# Altium PCB Monitor_Node.PcbDoc
Units mm, origin at the board's own origin, x right, y up, seen from the top; angles counter-clockwise.
Board outline 88.01 x 92.96 mm, 2 copper layers (Top Layer, Bottom Layer); 98 components, 63 nets, 354 pads, 41 vias.
Unrouted connection lines stored in the file: 2.
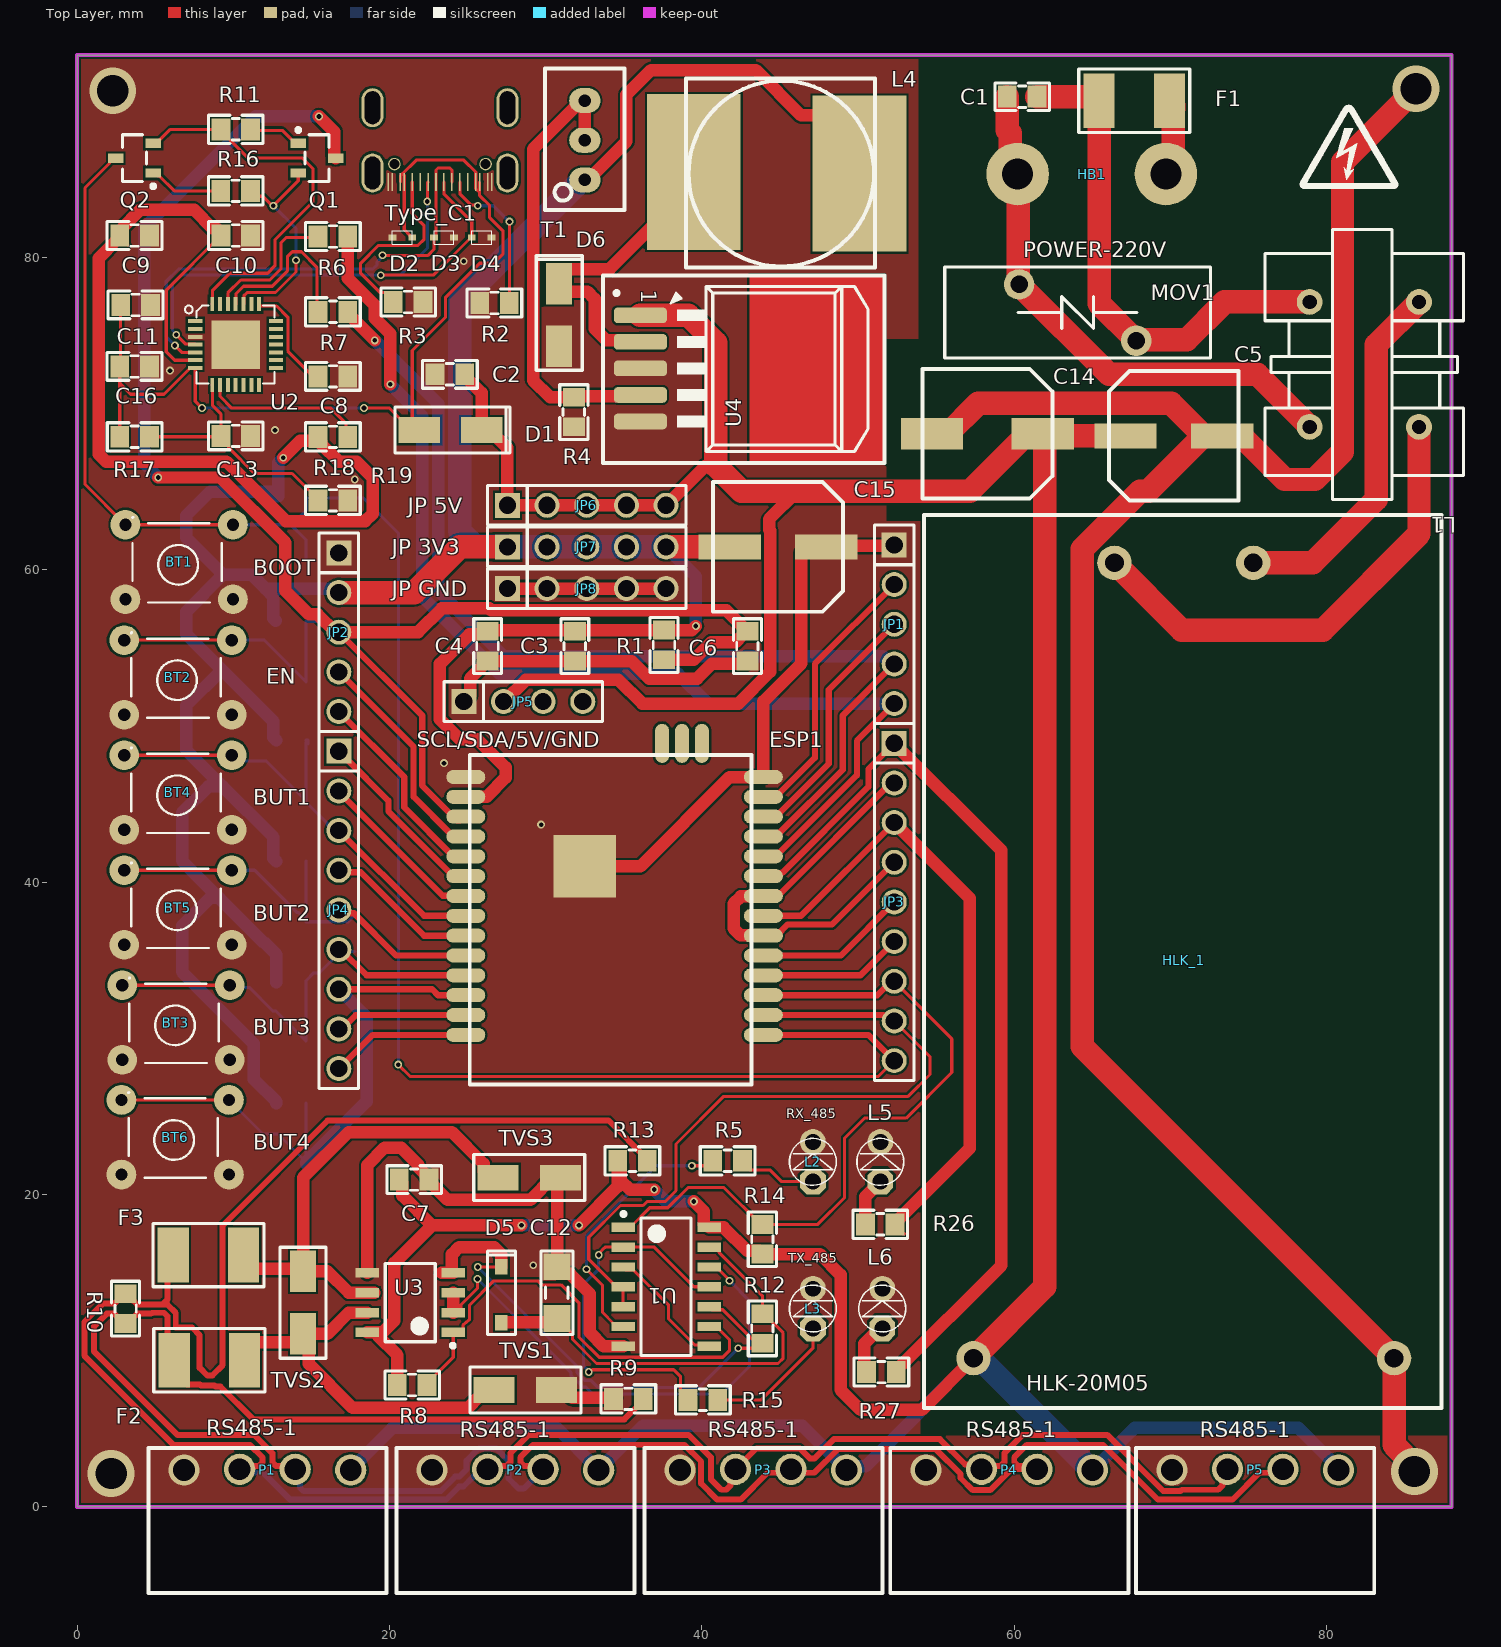
[diagram p0: Top Layer view]
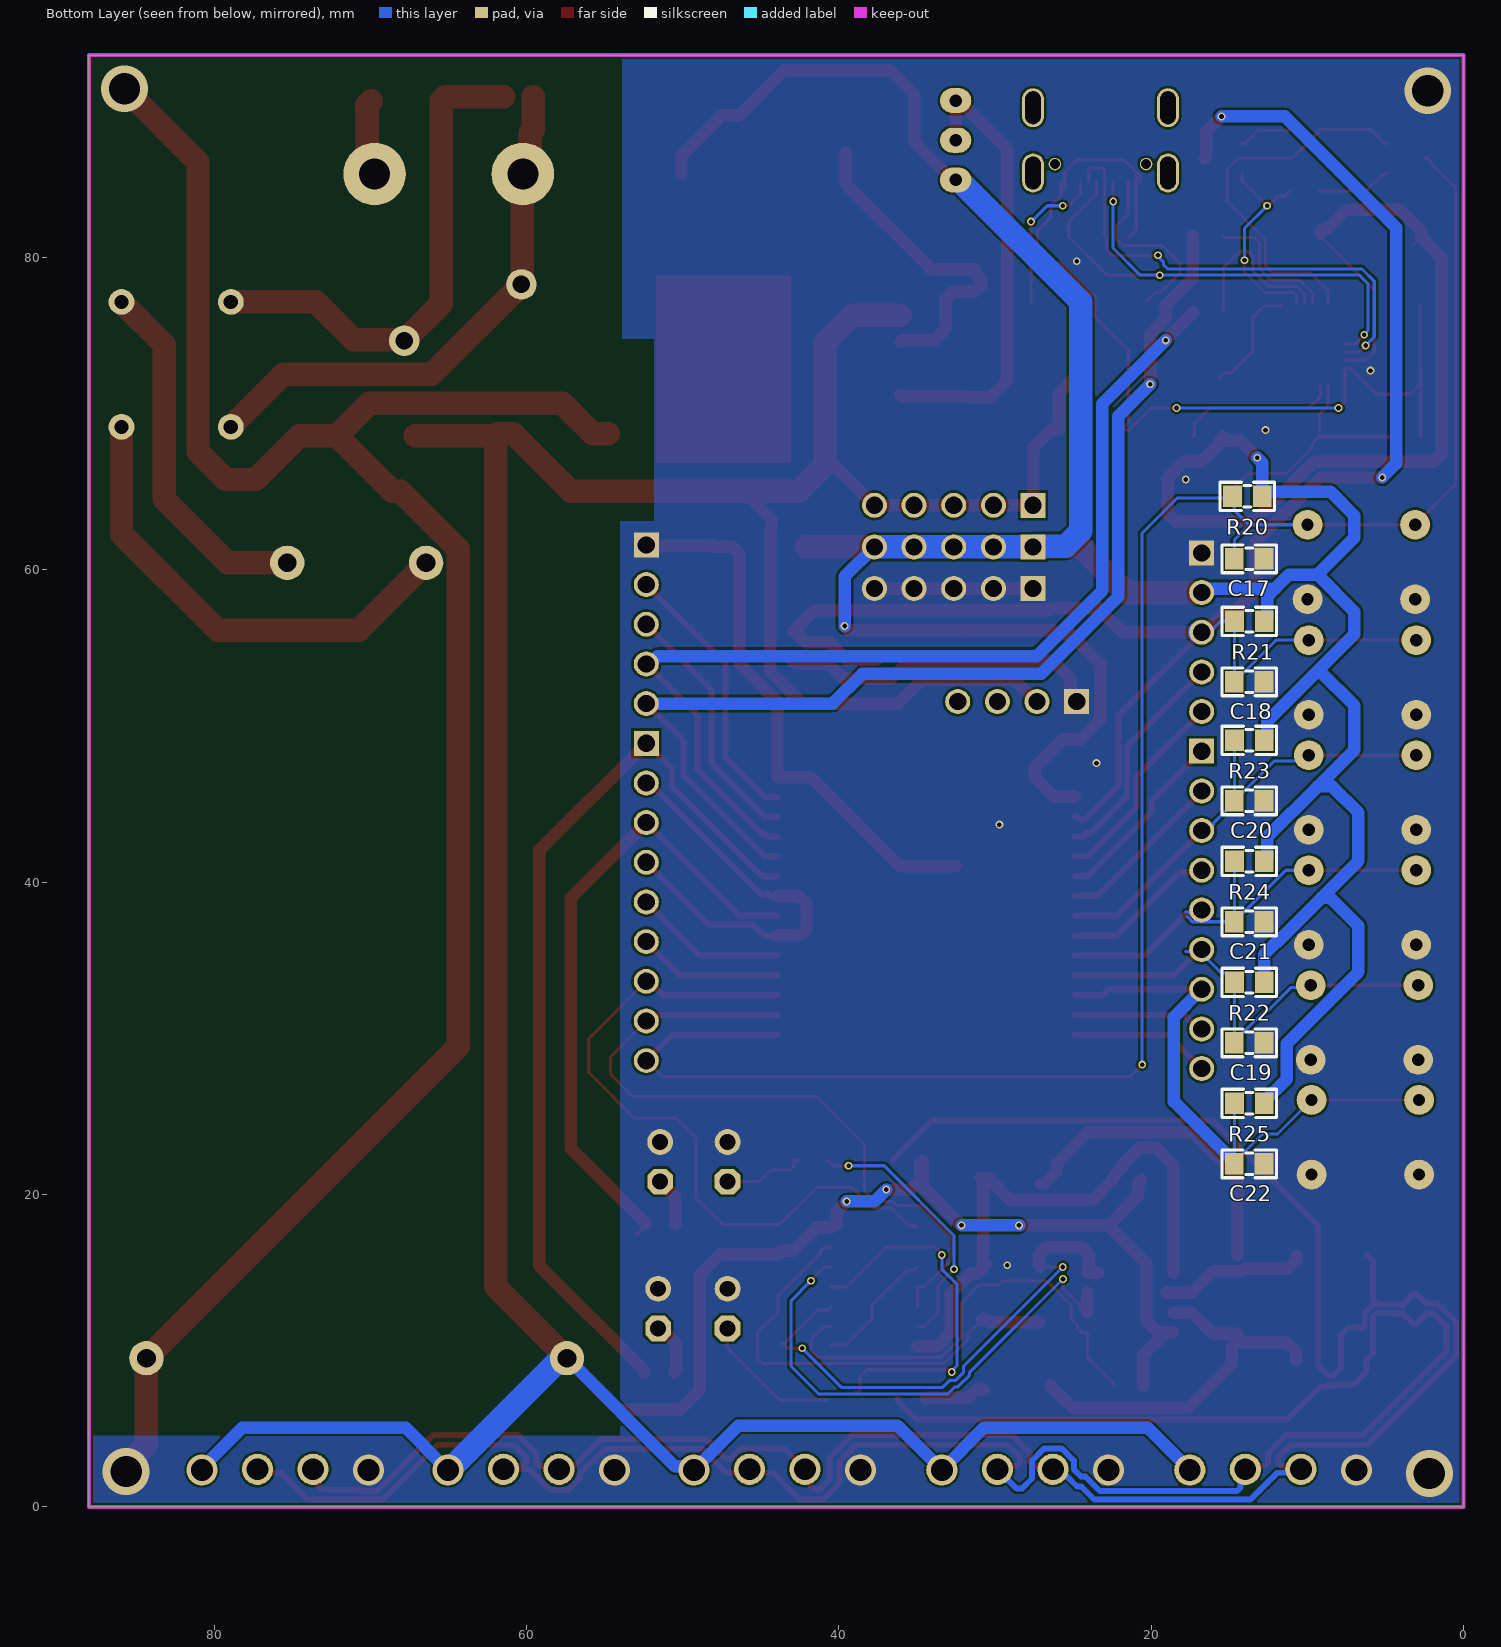
[diagram p1: Bottom Layer view, seen from below]
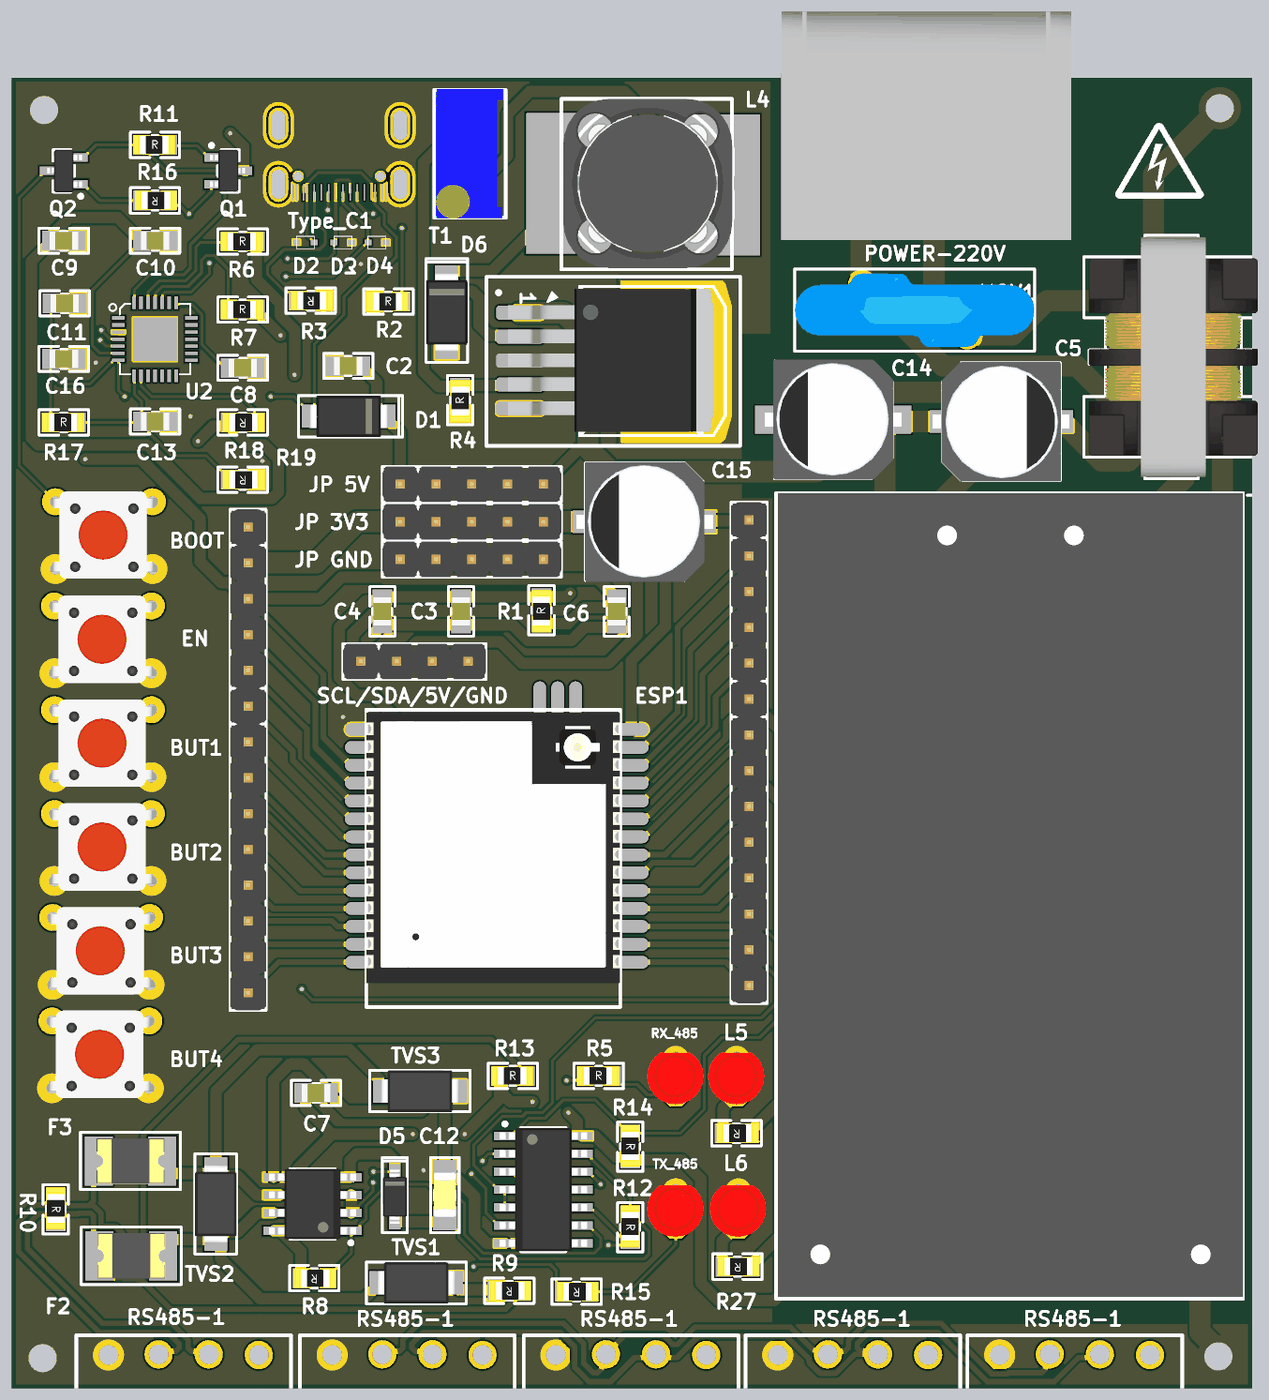
[diagram p2: 3D render of the assembled board from above, using the file's embedded part models]
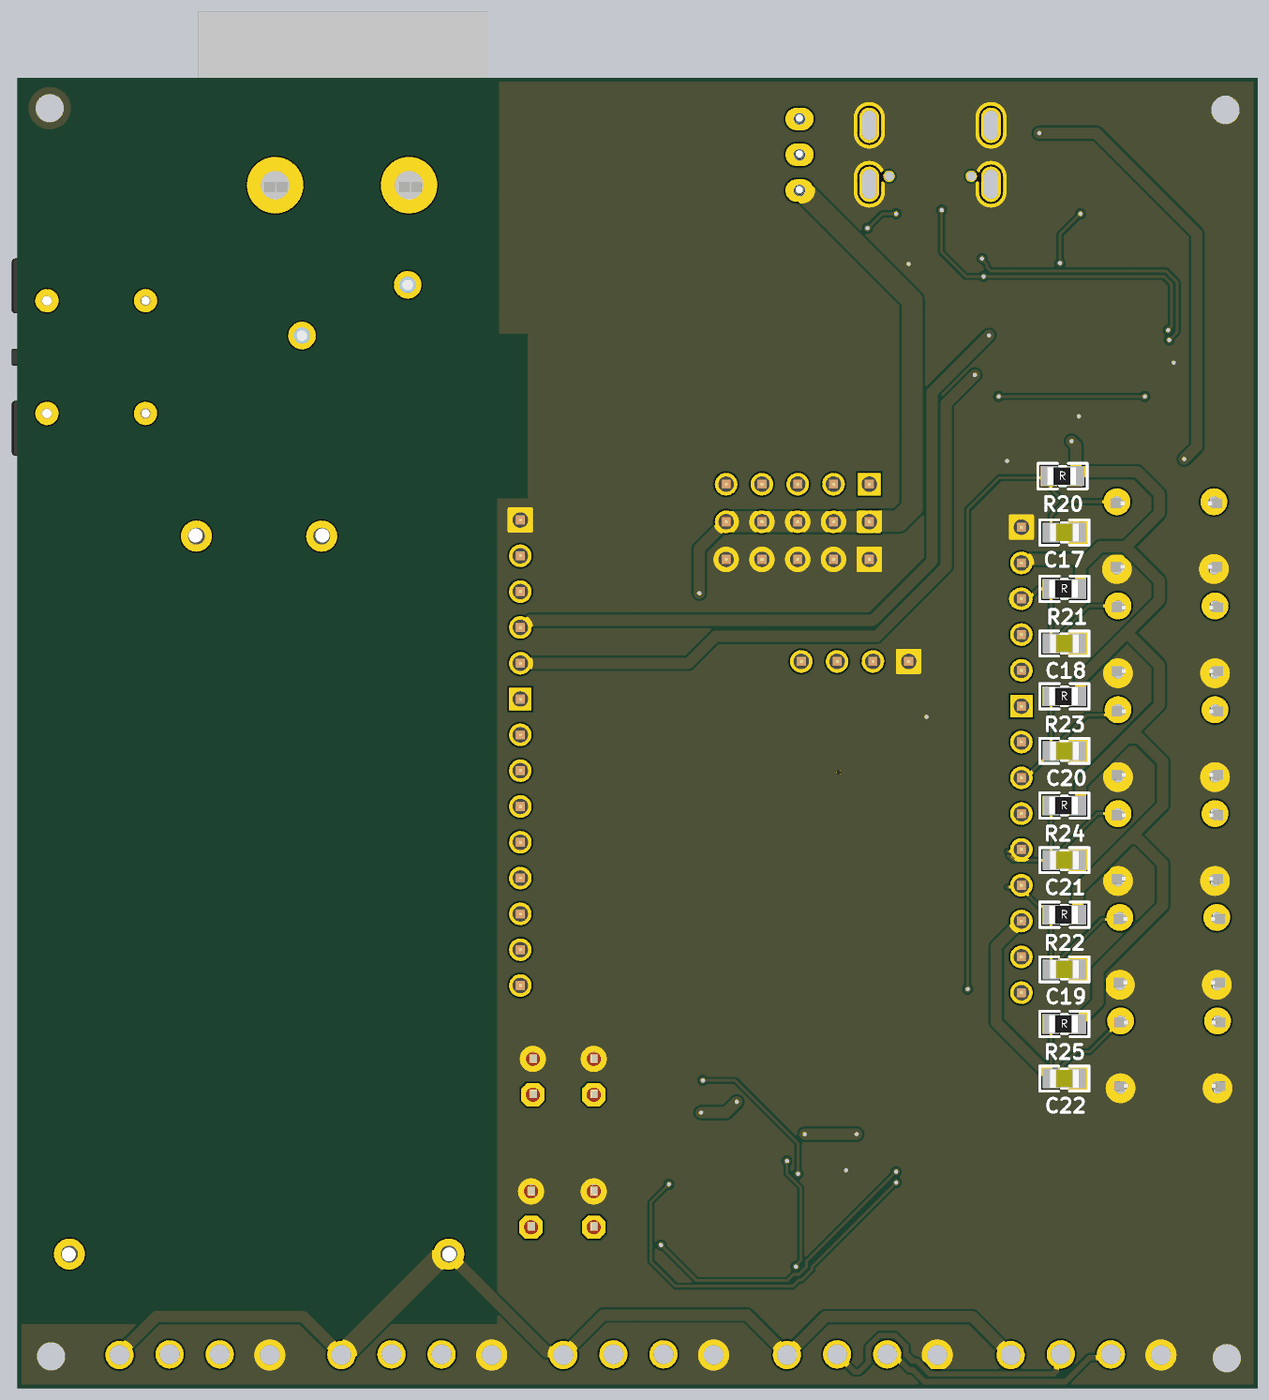
[diagram p3: 3D render of the assembled board from below, using the file's embedded part models]

## Layer stack, top to bottom
Top Solder: solder mask 0.0102, Solder Resist, Dk 3.5
Top Layer: signal copper 0.0356
Dielectric 1: dielectric 0.32, FR-4, Dk 4.8
Bottom Layer: signal copper 0.0356
Bottom Solder: solder mask 0.0102, Solder Resist, Dk 3.5

## Board outline
0,0 0,92.964 88.011,92.964 88.011,0

## Design rules (kind name [scope] priority, off if disabled: settings)
Clearance [All] p1: gap=0.15 ignorepadtopadclearanceinfootprint=FALSE
DiffPairsRouting [All] p1: maxlimit=0.5 minlimit=0.15 mostfreqgap=0.254 toplayer_minwidth=0.15 toplayer_maxwidth=0.381 toplayer_prefwidth=0.381 bottomlayer_minwidth=0.15 bottomlayer_maxwidth=0.381 bottomlayer_prefwidth=0.381 maxuncoupledlength=12.7
PolygonConnect [All] p1: connectstyle=Direct reliefconductorwidth=0.254 reliefentries=4 polygonreliefangle="90 Angle" airgapwidth=0.254
RoutingVias [All] p1: holewidth=0.711 width=1.27 viastyle="Through Hole" minholewidth=0.3 minwidth=0.5 maxholewidth=0.711 maxwidth=1.27
SilkToSilkClearance [All] p1: silktosilkclearance=0.1
SilkToSolderMaskClearance [IsPad] p1: minsilkscreentomaskgap=0.01 clearancetoexposedcopper=TRUE
SolderMaskExpansion [All] p1: expansion=0.102 istentingtop=FALSE
Width [All] p1: maxlimit=1.5 minlimit=0.2 preferedwidth=0.4
27 further rules are at their usual default settings.

## Classes and differential pairs
differential pair RS485: +RS485_P -RS485_N

## Components (designator, comment, footprint, x,y, rotation, side; value= is the part's Value field where it differs from the comment)
BT1 "BOOT" "Nut Nhan 4 Chan Cam 6x6" 9.652,57.912 r180 top
BT2 "EN" "Nut Nhan 4 Chan Cam 6x6" 9.576,50.521 r180 top
BT3 "BUT3" "Nut Nhan 4 Chan Cam 6x6" 9.449,28.423 r180 top
BT4 "BUT1" "Nut Nhan 4 Chan Cam 6x6" 9.576,43.155 r180 top
BT5 "BUT2" "Nut Nhan 4 Chan Cam 6x6" 9.576,35.789 r180 top
BT6 "BUT4" "Nut Nhan 4 Chan Cam 6x6" 9.398,21.082 r180 top
C1 "104 0.1uF/275V" "tu 0805" 60.517,90.294 r180 top
C2 "106" "tu 0805" 23.876,72.517 r180 top
C3 "106 (10V/20%)" "tu 0805" 31.877,55.118 r270 top
C4 "104 (10V/10%)" "tu 0805" 26.289,55.118 r270 top
C5 "220uF" "tu nhom 8 (e)" 70.231,68.58 r0 top
C6 "105 (10V/10%)" "tu 0805" 42.926,55.118 r270 top
C7 "104 100n" "tu 0805" 21.59,20.955 r180 top
C8 "104 (10V/10%)" "tu 0805" 16.383,72.39 r0 top
C9 "104 (10V/10%)" "tu 0805" 3.683,81.407 r0 top
C10 "104 (10V/10%)" "tu 0805" 10.16,81.407 r0 top
C11 "106 (10V/20%)" "tu 0805" 3.745,76.965 r0 top
C12 "100pF" "tu 1206" 30.734,13.716 r90 top
C13 "106 (10V/20%)" "tu 0805" 10.16,68.58 r0 top
C14 "100uF" "tu nhom 8 (f)" 58.293,68.707 r180 top
C15 "220uF" "tu nhom 8 (e)" 44.883,61.468 r180 top
C16 "104 (10V/10%)" "tu 0805" 3.683,73.025 r0 top
C17 "105 (10V/10%)" "tu 0805" 13.716,60.706 r0 bottom
C18 "105 (10V/10%)" "tu 0805" 13.716,52.832 r0 bottom
C19 "105 (10V/10%)" "tu 0805" 13.716,29.718 r0 bottom
C20 "105 (10V/10%)" "tu 0805" 13.716,45.212 r0 bottom
C21 "105 (10V/10%)" "tu 0805" 13.716,37.465 r0 bottom
C22 "105 (10V/10%)" "tu 0805" 13.716,21.971 r0 bottom
D1 "1N5819(SS14)-SM" SMA-J_DO-214AC 23.908,68.961 r0 top
D2 "LESD5D5.0CT1G" LESD5D5.0CT1G, 21.463,80.835 r90 top
D3 "LESD5D5.0CT1G" LESD5D5.0CT1G, 22.86,81.725 r270 top
D4 "LESD5D5.0CT1G" LESD5D5.0CT1G, 25.273,81.725 r270 top
D5 "1N4148(T4)-SM" SOD123G_DO-215AD 27.178,13.589 r90 top
D6 "1N5824(SS54)-SM" SMA-J_DO-214AC 30.861,76.327 r90 top
ESP1 "ESP32-C5-WROOM-1/1U" ESP32-C5-WROOM-1/1U 25.146,27.051 r0 top
F1 "FUSE-CHIP-SM" FUSE-CHIP-1812-SM 67.691,90.043 r180 top
F2 "FUSE 1208" FUSE-CHIP-1812-SM 8.473,9.398 r180 top
F3 "FUSE 1208" FUSE-CHIP-1812-SM 8.418,16.129 r180 top
HB1 "POWER-220V" HB9500 69.723,85.344 r180 top
HLK_1 "HLK_20M05" HLK_20M05 87.376,63.5 r180 top
JP1 "JP esp" "JP 1x5 DT" 52.324,61.595 r270 top
JP2 "JP esp" "JP 1x5 DT" 16.764,61.087 r270 top
JP3 "JP esp" "JP 1x9 DT" 52.324,48.895 r270 top
JP4 "JP esp" "JP 1x9 DT" 16.764,48.387 r270 top
JP5 "SCL/SDA/5V/GND" "JP 1x4 DT" 24.765,51.562 r0 top
JP6 "JP 5V" "JP 1x5 DT" 27.559,64.135 r0 top
JP7 "JP 3V3" "JP 1x5 DT" 27.559,61.468 r0 top
JP8 "JP GND" "JP 1x5 DT" 27.559,58.801 r0 top
L1 "10uH" L-UU9.8-L17.0-W12.0-H17.0-TH 82.423,73.152 r90 top
L2 "RX_485" LED-3MM-RED 47.117,20.828 r90 top
L3 "TX_485" LED-3MM-RED 47.117,11.43 r90 top
L4 "33uH - 3A SMD" "Cuon Cam 12x12x10" 51.097,79.371 r90 top
L5 "LED_1" LED-3MM-RED 51.435,20.828 r90 top
L6 "LED_2" LED-3MM-RED 51.562,11.43 r90 top
MOV1 "10D561-560V" MOV-P7.5-D17.0-T3.6-TH 64.068,76.476 r180 top
P1 "RS485-1" "15EDG - 4P" 19.812,3.762 r180 top
P2 "RS485-1" "15EDG - 4P" 35.687,3.762 r180 top
P3 "RS485-1" "15EDG - 4P" 51.562,3.762 r180 top
P4 "RS485-1" "15EDG - 4P" 67.31,3.762 r180 top
P5 "RS485-1" "15EDG - 4P" 83.058,3.762 r180 top
Q1 "S8050(J3Y)-SM" SOT23-3_TO-236AB 15.367,86.36 r0 top
Q2 "S8050(J3Y)-SM" SOT23-3_TO-236AB 3.683,86.36 r180 top
R1 "10k" "tro smd 0805" 37.526,55.188 r90 top
R2 "5.1k" "tro smd 0805" 26.727,77.15 r0 top
R3 "5.1k" "tro smd 0805" 21.209,77.089 r180 top
R4 "1.2k" "tro smd 0805" 31.75,70.104 r90 top
R5 "1k" "tro smd 0805" 41.656,22.225 r0 top
R6 "4.7k" "tro smd 0805" 16.383,81.407 r0 top
R7 "4.7k" "tro smd 0805" 16.383,76.581 r0 top
R8 "4.7k" "tro smd 0805" 21.463,7.747 r180 top
R9 "4.7k" "tro smd 0805" 35.306,6.858 r180 top
R10 "120R" "tro smd 0805" 3.175,12.7 r270 top
R11 "10k" "tro smd 0805" 10.16,88.265 r0 top
R12 "56k" "TRO SMD 0805" 43.942,11.43 r270 top
R13 "4.7k" "tro smd 0805" 35.56,22.225 r0 top
R14 "4.7k" "tro smd 0805" 43.942,17.145 r270 top
R15 "1k" "tro smd 0805" 40.075,6.797 r180 top
R16 "10k" "tro smd 0805" 10.16,84.201 r180 top
R17 "22k" "tro smd 0805" 3.683,68.58 r0 top
R18 "1k" "tro smd 0805" 16.383,68.453 r180 top
R19 "22k" "tro smd 0805" 16.383,64.389 r180 top
R20 "10k" "tro smd 0805" 13.843,64.77 r180 bottom
R21 "10k" "tro smd 0805" 13.716,56.769 r180 bottom
R22 "10k" "tro smd 0805" 13.716,33.655 r180 bottom
R23 "10k" "tro smd 0805" 13.716,49.149 r180 bottom
R24 "10k" "tro smd 0805" 13.716,41.402 r180 bottom
R25 "10k" "tro smd 0805" 13.716,25.908 r180 bottom
R26 "330R" "Tro SMD 0805" 51.435,18.034 r180 top
R27 "330R" "Tro SMD 0805" 51.5,8.575 r180 top
T1 "10K" "Bien Tro Vi Chinh Dung" 32.512,87.503 r90 top
TVS1 "SMAJ6.5CA-SM" SMA-J_DO-214AC_TVS-BI 28.702,7.493 r0 top
TVS2 "SMAJ6.5CA-SM" SMA-J_DO-214AC_TVS-BI 14.478,13.081 r270 top
TVS3 "SMAJ6.5CA-SM" SMA-J_DO-214AC_TVS-BI 28.956,21.082 r180 top
Type_C1 "Type_C_16P" Type_C_16P 23.241,84.836 r180 top
U1 "74HC14-SM" SOIC14-1.27-150MIL 37.719,14.097 r0 top
U2 "cp2102" cp2102 10.16,74.422 r0 top
U3 "MAX485-SM" SOIC8-1.27-150MIL 21.336,13.081 r180 top
U4 "LM2976" TO263 42.037,73.279 r270 top

## Footprints (in the part's own frame and the unit in brackets; to place one, negate y for a bottom-side part, rotate by r counter-clockwise, add the part's x,y. Pads: shape width x height; smd on the part's side, far side on the other; paste and mask are expansions set on the pad)
"15EDG - 4P" [mm]
  round 2 hole 1.4: 1(2.286,1.397) 2(5.842,1.349) 3(9.398,1.349) 4(12.954,1.397)
  silkscreen extent 0,0 15.24,9.27
"Bien Tro Vi Chinh Dung" [mm] "Bien tro vi chinh"
  oval 1.6x2 hole 0.8: 1(-2.54,0) 2(0,0) 3(2.54,0)
  silkscreen extent -4.47,-2.54 4.6,2.54, body extent -4.54,-2.4 4.66,2.4, height 12.02
cp2102 [mm]
  rect 0.9x0.254 smd: 1(-2.59,1.5) 2(-2.59,1) 3(-2.59,0.5) 4(-2.59,0) 5(-2.59,-0.5) 6(-2.59,-1) 7(-2.59,-1.5) 15(2.59,-1.5) 16(2.59,-1) 17(2.59,-0.5) 18(2.59,0) 19(2.59,0.5) 20(2.59,1) 21(2.59,1.5)
  rect 0.254x0.9 smd: 8(-1.5,-2.59) 9(-1,-2.59) 10(-0.5,-2.59) 11(0,-2.59) 12(0.5,-2.59) 13(1,-2.59) 14(1.5,-2.59) 22(1.5,2.59) 23(1,2.59) 24(0.5,2.59) 25(0,2.59) 26(-0.5,2.59) 27(-1,2.59) 28(-1.5,2.59)
  rect 3.1x3.1 smd: 29(0,0)
  silkscreen extent -3.25,-2.5 2.5,2.5, body extent -2.51,-2.51 2.5,2.5, height 0.5
"Cuon Cam 12x12x10" [mm] "Cuon Cam 12x12x10"
  rect 10x6 smd: 1(6.1,11.6) 2(6,1)
  silkscreen extent 0,0 12.1,12.1, body extent 0.1,-0.2 12.1,12.14, height 7.51
ESP32-C5-WROOM-1/1U [mm] "QFP, 62-Leads, Body 15.40x19.35mm, Pitch 0.65mm, IPC Medium Density"
  oval 2.5x0.9 smd: 1(-0.254,19.685) 2(-0.254,18.415) 3(-0.254,17.145) 4(-0.254,15.875) 5(-0.254,14.605) 6(-0.254,13.335) 7(-0.254,12.065) 8(-0.254,10.795) 9(-0.254,9.525) 10(-0.254,8.255) 11(-0.254,6.985) 12(-0.254,5.715) 13(-0.254,4.445) 14(-0.254,3.175) 15(18.796,3.175) 16(18.796,4.445) 17(18.796,5.715) 18(18.796,6.985) 19(18.796,8.255) 20(18.796,9.525) 21(18.796,10.795) 22(18.796,12.065) 23(18.796,13.335) 24(18.796,14.605) 25(18.796,15.875) 26(18.796,17.145) 27(18.796,18.415) 28(18.796,19.685)
  rect 4x4 smd: 29(7.366,13.97)
  oval 0.9x2.5 smd: 30(14.859,21.844) 31(13.589,21.844) 32(12.319,21.844)
  silkscreen extent 0,0 18.03,21.08, body extent 0.01,1.68 18.03,20.88, height 3.1
FUSE-CHIP-1812-SM [mm]
  rect 2x3.5 smd: 1(-2.25,0) 2(2.25,0)
  silkscreen extent -3.56,-2.03 3.56,2.03, body extent -2.41,-1.61 2.41,1.61, height 1.32
HB9500 [mm]
  round 4 hole 2: 1(0,0) 2(9.5,0)
  body extent -5.47,-12.32 15.13,3.88, height 25.04
HLK_20M05 [mm]
  round 2.2 hole 1.2: 1(12.065,3.048) 2(20.955,3.048) 3(3.048,53.975) 4(29.972,53.975)
  silkscreen extent 0,0 33.15,57.15, body extent 0,0 33,57, height 23
"JP 1x4 DT" [mm] "4 pins, 1 row, straight, gold plating"
  rect 1.6x1.6 hole 1.1: 1(0,0)
  round 1.6 hole 1.1: 2(2.54,0) 3(5.08,0) 4(7.62,0)
  silkscreen extent -1.27,-1.27 8.89,1.27, body extent -1.27,-1.27 8.89,1.27, height 8.54
"JP 1x5 DT" [mm] "5 pins, 1 row, straight, gold plating"
  rect 1.6x1.6 hole 1.1: 1(0,0)
  round 1.6 hole 1.1: 2(2.54,0) 3(5.08,0) 4(7.62,0) 5(10.16,0)
  silkscreen extent -1.27,-1.27 11.43,1.27, body extent -1.27,-1.27 11.43,1.27, height 8.54
"JP 1x9 DT" [mm] "9 pins, 1 row, straight, gold plating"
  rect 1.6x1.6 hole 1.1: 1(0,0)
  round 1.6 hole 1.1: 2(2.54,0) 3(5.08,0) 4(7.62,0) 5(10.16,0) 6(12.7,0) 7(15.24,0) 8(17.78,0) 9(20.32,0)
  silkscreen extent -1.27,-1.27 21.59,1.27, body extent -1.27,-1.27 21.59,1.27, height 8.54
L-UU9.8-L17.0-W12.0-H17.0-TH [mil]
  round 65 hole 36: 1(-157.48,137.8) 2(-157.48,-137.8) 3(157.48,137.8) 4(157.48,-137.8)
  silkscreen extent -340,-250 340,250, body extent -335,-236 335,236, height 669
LED-3MM-RED [mil]
  oct 65x65 hole 40: 1(0,0)
  round 65 hole 40: 2(100,0)
  silkscreen extent -9,-59 109,59, body extent -27,-77 117,80, height 181
LESD5D5.0CT1G, [mm]
  rect 0.4x0.5 smd: 1(0.445,1.27) 2(0.445,0)
  silkscreen extent 0,0 0.89,1.27
MOV-P7.5-D17.0-T3.6-TH [mil]
  round 77 hole 44: 1(-147.64,70.87) 2(147.64,-70.87)
  silkscreen extent -335,-115 335,115, body extent -335,-102 335,102, height 787
"Nut Nhan 4 Chan Cam 6x6" [mil] "SW button 4pin, 250 x250 mil"
  round 75 hole 31: 1(-13,-8) 1(258,-8) 2(-13,-196) 2(258,-196)
  silkscreen extent 15,-215 240,0, body extent -31,-225 281,19, height 276
SMA-J_DO-214AC [mm]
  rect 2.65x1.65 smd: 1(-2,0) 2(2,0)
  silkscreen extent -3.55,-1.49 3.81,1.46, body extent -2.8,-1.49 2.8,1.46, height 2.9
SMA-J_DO-214AC_TVS-BI [mm]
  rect 2.65x1.65 smd: 1(-2,0) 2(2,0)
  silkscreen extent -3.55,-1.49 3.56,1.46, body extent -2.8,-1.48 2.8,1.48, height 2.9
SOD123G_DO-215AD [mm]
  rect 1x0.8 smd: 1(-1.8,0) 2(1.8,0)
  silkscreen extent -2.54,-0.89 2.79,0.89, body extent -1.92,-0.85 1.93,0.85, height 1.35
SOIC8-1.27-150MIL [mm]
  rect 1.5x0.6 smd: 1(-2.75,1.905) 2(-2.75,0.635) 3(-2.75,-0.635) 4(-2.75,-1.905) 5(2.75,-1.905) 6(2.75,-0.635) 7(2.75,0.635) 8(2.75,1.905)
  silkscreen extent -2.85,-2.5 1.6,2.88, body extent -3.1,-2.5 3.1,2.5, height 1.75
SOIC14-1.27-150MIL [mm]
  rect 1.5x0.6 smd: 1(-2.75,3.81) 2(-2.75,2.54) 3(-2.75,1.27) 4(-2.75,0) 5(-2.75,-1.27) 6(-2.75,-2.54) 7(-2.75,-3.81) 8(2.75,-3.81) 9(2.75,-2.54) 10(2.75,-1.27) 11(2.75,0) 12(2.75,1.27) 13(2.75,2.54) 14(2.75,3.81)
  silkscreen extent -2.85,-4.4 1.6,4.78, body extent -3.1,-4.37 3.1,4.38, height 1.75
SOT23-3_TO-236AB [mm]
  rect 1x0.6 smd: 1(-1.2,0.95) 2(-1.2,-0.95) 3(1.2,0)
  silkscreen extent -1.32,-1.5 0.76,1.92, body extent -1.3,-1.5 1.3,1.5, height 1.1
TO263 [mm]
  rrect50% 1x3.4 smd: 1(-3.019,-5.969) 2(-1.319,-5.969) 4(2.081,-5.969) 5(3.781,-5.969)
  rrect50% 1x3.4 smd mask+0: 3(0.381,-5.969)
  Top Layer region: -5.568,1.016 6.432,1.016 6.432,9.65 -5.568,9.65
  silkscreen extent -5.57,-8.35 6.43,9.65, body extent -4.73,-6.84 5.43,7.8, height 4.57
"tro smd 0805" [mm]
  rect 1.2x1.4 smd: 1(-0.946,-0.061) 2(0.954,-0.061)
  silkscreen extent -1.75,-0.97 1.75,0.84, body extent -1.56,-0.76 1.44,0.64, height 0.53
"TRO SMD 0805" [mm]
  rect 1.2x1.4 smd: 1(-0.946,-0.061) 2(0.954,-0.061)
  silkscreen extent -1.75,-0.97 1.75,0.84, body extent -1.56,-0.76 1.44,0.64, height 0.53
"Tro SMD 0805" [mm]
  rect 1.2x1.4 smd: 1(-0.946,-0.061) 2(0.954,-0.061)
  silkscreen extent -1.75,-0.97 1.75,0.84, body extent -1.56,-0.76 1.44,0.64, height 0.53
"tu 0805" [mm] "Compoment SMD 80x50mil"
  rect 1.2x1.4 smd: 1(-0.946,-0.003) 2(0.954,-0.003)
  silkscreen extent -1.75,-0.89 1.75,0.89, body extent -1.01,-0.64 1.01,0.63, height 0.61
"tu 1206" [mm]
  rect 1.7x1.7 smd: 1(-1.65,0) 2(1.65,0)
  silkscreen extent -2.67,-1.02 2.67,1.02, body extent -1.57,-0.8 1.63,0.8, height 0.94
"tu nhom 8 (e)" [mm]
  rect 4x1.6 smd: 1(-3.1,0) 2(3.1,0)
  silkscreen extent -4.15,-4.15 4.15,4.15, body extent -4.88,-4.25 4.82,4.25, height 10.5
"tu nhom 8 (f)" [mm]
  rect 4x2 smd: 1(-3.55,0) 2(3.55,0)
  silkscreen extent -4.15,-4.15 4.15,4.15, body extent -4.85,-4.25 4.85,4.25, height 10.5
Type_C_16P [mm]
  rect 0.1x1.15 smd: A1(-3.302,0) A4(-2.54,0) A5(-1.27,0) A6(-0.25,0) A7(0.254,0) A8(1.274,0) A9(2.54,0) A12(3.302,0) B1(3.048,0) B4(2.286,0) B5(1.778,0) B6(0.762,0) B7(-0.762,0) B8(-1.774,0) B9(-2.286,0) B12(-3.048,0)
  rrect100% 1.4x2.5 hole 2.1 slot 1 at 0 deg mask+0.4: ""(-4.32,-4.755) ""(-4.316,-0.575) ""(4.32,-0.575) ""(4.32,-4.755)
  round 0.8 hole 0.65 mask+0: ""(-2.921,-1.143) ""(2.921,-1.143)
  body extent -4.47,-7.48 4.47,0.12, height 3.23

## Part data
BT1 BT2 BT3 BT4 BT5 BT6: library part "Nut Nhan 4 Chan Cam 6x6", "Nut Nhan 4 Chan 6x6mm", Ma_Hang=MH004584, Ten="Nút Nhấn 4 Chân 6x6x5MM DIP"
C1 C4 C7 C8 C9 C10 C16: library part "Tu 0805 104 50V 10%", "Dán", Chung_Loai=Dán, Don_Vi=Con, Ma_Hang=MH004551, So_Chan=2, Ten_Linh_Kien="Tụ 0805 104-100nF 10% 50V"
C2 C3 C11 C13: library part "Tu 0805 106 16V 10%", "Dán", Chung_Loai=Dán, Don_Vi=Con, Ma_Hang=MH004553, So_Chan=2, Ten_Linh_Kien="Tụ 0805 106-10uF 10% 16V"
C5 C15: library part "Tu Nhom 220uF 10V", "Dán", Chung_Loai=Dán, Don_Vi=Con, Ma_Hang=MH004021, So_Chan=2, Ten_Linh_Kien="Tụ Nhôm 220uF 10V"
C6 C17 C18 C19 C20 C21 C22: library part "Tu 0805 105 50V 10%", "Dán", Chung_Loai=Dán, Don_Vi=Con, Ma_Hang=MH004552, So_Chan=2, Ten_Linh_Kien="Tụ 0805 105-1uF 10% 50V"
C12: library part "Tu 1206 4.7nF 50V", "Dán", Chung_Loai=Dán, Don_Vi=Con, Ma_Hang=MH007538, So_Chan=2, Ten_Linh_Kien="Tụ 1206 4.7nF 50V NPO"
C14: library part "Tu Nhom 100uF 50V", "Dán", Chung_Loai=Dán, Don_Vi=Con, Ma_Hang=MH002223, So_Chan=2, Ten_Linh_Kien="Tụ Nhôm 100uF 50V 8x10.2MM"
D1: "1.0A Schottky Barrier Rectifiers - Surface Mount"
D5: "Fast Switching Diode - Surface Mount"
D6: "5.0A Schottky Barrier Rectifiers - Surface Mount"
F1: "Chip Fuses - Surface Mount"
F2 F3: library part FUSE-CHIP-SM, "Chip Fuses - Surface Mount"
HB1: library part HB9500
JP1 JP2 JP6 JP7 JP8: library part "JP 1x5 2.54 Duc Thang", "Cắm", Chung_Loai=Cắm, Don_Vi=Con, Ma_Hang=MH000903, Ten_Linh_Kien="Jump Đơn Đực 2.54MM 1x40P Thẳng 11MM"
JP3 JP4: library part "JP 1x9 2.54 Duc Thang", "Cắm", Chung_Loai=Cắm, Don_Vi=Con, Ma_Hang=MH000903, Ten_Linh_Kien="Jump Đơn Đực 2.54MM 1x40P Thẳng 11MM"
JP5: library part "JP 1x4 2.54 Duc Thang", "Cắm", Chung_Loai=Cắm, Don_Vi=Con, Ma_Hang=MH000903, Ten_Linh_Kien="Jump Đơn Đực 2.54MM 1x40P Thẳng 11MM"
L1: library part L-FILTER-TH, "EMI Filter Inductor - Through Hole"
L2 L3 L5 L6: library part "LED 3mm Do", "Cắm", Chung_Loai=Cắm, Don_Vi=Con, Ma_Hang=MH003892, Ten_Linh_Kien="Led 3MM Phủ Đỏ (10c)"
L4: library part "CUON CAM 100uH SMD", "Dán", Chung_Loai=Dán, Don_Vi=Con, Ten_Linh_Kien="Cuộn Cảm 100uH 7x7x4MM CD74"
MOV1: library part MOV-TH, "Metal Oxide Varistor - Through Hole"
P1 P2 P3 P4 P5: library part "15EDG - 4P", "15EDG - 4P - 3.81 mm"
Q1 Q2: "0.5A 25V NPN General Purpose Transistors - Surface Mount"
R1 R11 R16 R20 R21 R22 R23 R24 R25: library part "Tro 0805 5% 10k", "Dán", Chung_Loai=Dán, Don_Vi=Con, Ma_Hang=MH005239, So_Chan=2, Ten_Linh_Kien="Trở 0805 5% 10k"
R2 R3: library part "Tro 0805 1% 5.1k", "Dán", Chung_Loai=Dán, Don_Vi=Con, Ma_Hang=MH008812, So_Chan=2, Ten_Linh_Kien="Trở 0805 1% 5.1k"
R4: library part "Tro 0805 5% 1.2k", "Dán", Chung_Loai=Dán, Don_Vi=Con, Ma_Hang=MH005231, So_Chan=2, Ten_Linh_Kien="Trở 0805 5% 1.2k"
R5 R15 R18: library part "Tro 0805 1% 1k", "Dán", Chung_Loai=Dán, Don_Vi=Con, Ma_Hang=MH005468, So_Chan=2, Ten_Linh_Kien="Trở 0805 1% 1k"
R6 R7 R8 R9 R13 R14: library part "Tro 0805 5% 4.7k", "Dán", Chung_Loai=Dán, Don_Vi=Con, Ma_Hang=MH005307, So_Chan=2, Ten_Linh_Kien="Trở 0805 5% 4.7k"
R10: library part "Tro 0805 5% 120R", "Dán", Chung_Loai=Dán, Don_Vi=Con, Ma_Hang=MH005253, So_Chan=2, Ten_Linh_Kien="Trở 0805 5% 120R"
R12: library part "Tro 0805 5% 56k", "Dán", Chung_Loai=Dán, Don_Vi=Con, Ma_Hang=MH005322, So_Chan=2, Ten_Linh_Kien="Trở 0805 5% 56k"
R17 R19: library part "Tro 0805 5% 22k", "Dán", Chung_Loai=Dán, Don_Vi=Con, Ma_Hang=MH005248, So_Chan=2, Ten_Linh_Kien="Trở 0805 5% 22k"
R26 R27: library part "Tro 0805 5% 330R", "Dán", Chung_Loai=Dán, Don_Vi=Con, Ma_Hang=MH005337, So_Chan=2, Ten_Linh_Kien="Trở 0805 5% 330R"
T1: library part "Bien Tro Tinh Chinh 10K Dung", "Cắm", Chung_Loai=Cắm, Don_Vi=Con, Ma_Hang=MH003232, Ten_Linh_Kien="Biến Trở VR 103-10K 3296W"
TVS1 TVS2 TVS3: "ESD Suppressors/TVS Diodes 6.5V Bi-Dir - Surface Mount"
U1: "Hex Inverting Schmitt Trigger - Surface Mount"
U3: "Low-Power, Slew-Rate-Limited RS-485/RS-422 Transceivers - Surface Mount"
U4: library part LM2596, Max Input Voltage="12 V", Max Output Current="3 (6.0 peak) A", Max Output Voltage=mV, Temperature Range="-40 to +125 degC", Category=IC-Power, Min Input Voltage=mV, Min Output Voltage=mV, Mounting Technology="Surface Mount", Status=Unreleased, Supply Voltage=mV

## Via types
v1: diameter 0.5, hole 0.3, Top Layer to Bottom Layer, tented both sides, 37 vias
v2: diameter 3, hole 2, Top Layer to Bottom Layer, tented both sides, 4 vias

## Nets (pads, with @x,y where several pads share a name; then routed paths per layer and width w, separated by ;. In a path a pad name is that pad's centre, name@x,y a point inside that pad or via, vN(x,y) a via of type N, cw(c..) or ccw(c..) an arc to the next point about the centre after c; other vN are vias at no path point)
3V3: C3.1 C4.1 C9.1 C10.1 C15.2 ESP1.2 JP2.2 JP7.1 JP7.2 JP7.3 JP7.4 JP7.5 L4.2 R1.2 R18.2 R20.2 R21.2 R22.2 R23.2 R24.2 R25.2 T1.1 U2.6 | length 268.4
  Top Layer w0.2: C9.1@2.737,81.304 3.237,80.804 C9.1@3.27,80.804 ; C9.1 C9.1@2.737,81.731 ; U2.6 6.249,73.422 5.739,73.932 5.717,73.954 5.717,77.906 C10.1
  Top Layer w0.8: C9.1 2.537,81.204 2.537,81.104 1.397,79.963 1.397,67.398 1.866,66.929 9.57,66.929 13.38,63.119 18.454,63.119 18.923,63.588 18.923,65.913 17.907,66.929 16.765,66.929 15.629,68.065 R18.2@15.629,68.214 ; C9.1@2.737,81.731 4.064,83.058 7.493,83.058 8.717,81.834 8.949,81.834 9.149,81.634 C10.1@9.149,81.534 ; v1(13.208,67.183) 14.285,68.26 15.229,68.26 15.429,68.46 R18.2 ; ESP1.2 24.911,45.485 26.243,45.485 27.449,46.691 27.449,47.354 25.654,49.149 24.511,49.149 23.241,50.419 23.241,53.975 25.13,55.864 25.986,55.864 26.256,56.134 C3.1@31.874,56.134 ; C3.1 31.944,56.134 37.578,56.134 R1.2 39.366,56.143 v1(39.624,56.401) ; T1.1 32.712,84.963 35.179,87.43 35.179,90.424 36.753,91.998 43.47,91.998 46.366,89.102 47.497,89.102 50.097,86.502 L4.2
  Top Layer w1.5: JP2.2 21.59,58.547 24.511,61.468 JP7.1 ; JP7.5 C15.2 C15.2@42.089,61.468
  Bottom Layer w0.2: R21.2@12.718,56.751 R21.2
  Bottom Layer w0.8: R21.2@12.718,56.751 12.562,56.908 12.562,58.304 12.065,58.801 ; R25.2 12.762,25.947 11.332,27.377 11.332,29.653 6.731,34.253 6.731,37.211 8.519,38.999 9.095,38.999 ; R22.2 12.762,35.371 11.965,36.168 11.922,36.168 11.459,36.632 11.459,36.635 9.095,38.999 ; R24.2 12.573,41.53 12.573,42.886 9.329,46.13 ; R23.2 12.571,49.279 12.571,50.294 9.271,53.594 ; v1(13.208,67.183) 12.889,66.864 12.889,64.832 R20.2@12.877,64.82 ; JP2.2@16.764,58.801 12.065,58.801 ; JP7.5 39.624,59.563 v1(39.624,56.401) ; 9.095,38.999 6.731,41.362 6.731,44.45 8.411,46.13 9.329,46.13 ; 9.271,53.594 6.985,55.88 6.985,57.314 9.361,59.69 ; 9.271,53.594 6.985,51.308 6.985,48.474 9.329,46.13 ; 9.361,59.69 6.985,62.066 6.985,63.463 8.531,65.009 12.689,65.009 R20.2@12.877,64.82 ; 9.361,59.69 11.176,59.69 12.065,58.801 ; R20.2@12.877,64.82 12.766,64.709 R20.2 12.889,64.809 R20.2@12.877,64.82
  Bottom Layer w1.5: T1.1 32.312,84.963 24.511,77.162 24.511,62.484 25.477,61.518 27.509,61.518 JP7.1 JP7.2 JP7.3 JP7.4 JP7.5
5V: C2.1 C5.1 C7.2 C14.1 D1.2 HLK_1.4 JP5.2 JP6.1 JP6.2 JP6.3 JP6.4 JP6.5 P1.1 P2.1 P3.1 P4.1 P5.1 R8.2 R13.1 R14.2 U1.14 U3.8 U4.1 | length 301.7
  Top Layer w0.2: U1.14@40.132,18.107 40.332,17.907 U1.14
  Top Layer w0.8: U3.8 19.558,11.176 20.32,11.938 20.32,15.621 22.733,18.034 ; U3.8@19.246,10.98 20.509,9.717 R8.2 ; C7.2 20.836,20.758 20.836,19.931 22.733,18.034 ; C2.1 24.822,72.42 25.908,71.334 D1.2 26.408,68.961 27.559,67.81 JP6.1 JP6.2 JP6.3 32.766,64.262 32.893,64.135 JP6.4 JP6.5 40.259,66.675 40.894,66.675 ; JP5.2 27.333,51.562 28.733,52.962 34.668,52.962 36.195,51.435 42.343,51.435 44.383,53.475 44.383,62.517 44.32,62.58 44.32,63.243 46.101,65.024 ; v1(28.455,18.03) 28.451,18.034 22.733,18.034 ; v1@32.131,18.034 34.614,20.517 R13.1 34.814,21.964 34.814,20.914 35.409,20.32 v1(36.957,20.32) ; v1(39.497,19.558) 40.132,18.923 U1.14@40.132,18.107 ; U1.14 40.471,17.905 41.404,17.905 42.918,16.391 43.681,16.391 R14.2 47.563,16.191 48.895,14.859 48.895,7.493 50.165,6.223 54.102,6.223 HLK_1.4
  Top Layer w1.5: U4.1 39.145,76.298 40.894,74.549 40.894,66.675 42.545,65.024 46.101,65.024 57.16,65.024 C14.1@60.716,68.58 ; HLK_1.4 61.97,14.091 61.97,68.58 C5.1 ; C14.1@60.843,68.707 C14.1
  Bottom Layer w0.8: P1.1 20.241,5.08 30.686,5.08 P2.1 36.243,5.207 46.434,5.207 P3.1 49.506,2.595 50.474,2.595 HLK_1.4 ; v1(28.455,18.03) v1(32.138,18.03) ; v1(36.957,20.32) 37.719,19.558 v1(39.497,19.558) ; P4.1 65.024,2.54 65.199,2.54 67.739,5.08 78.184,5.08 P5.1@80.772,2.492
  Bottom Layer w1.5: HLK_1.4 57.593,9.525 57.943,9.175 58.135,9.175 64.945,2.365 P4.1
BOOT: BT1.2 C17.2 ESP1.15 JP3.9 Q2.3 R20.1 | length 123.2
  Top Layer w0.2: Q2.3 2.283,86.36 2.083,86.16 2.083,86.03 0.508,84.455 0.508,65.481 3.099,62.89 BT1.2@9.982,62.89 ; v1(20.574,28.321) 21.336,27.559 51.308,27.559 JP3.9
  Top Layer w0.4: ESP1.15 50.673,30.226 JP3.9
  Bottom Layer w0.2: BT1.2@9.982,62.89 13.691,62.89 ; C17.2 14.67,61.911 13.691,62.89 ; v1(20.574,28.321) 20.574,62.357 18.333,64.598 14.677,64.598 14.677,63.826 13.741,62.89 13.691,62.89
BUT1: BT4.2 C20.2 ESP1.8 JP4.3 R23.1 | length 31.1
  Top Layer w0.2: BT4.2@3.023,48.133 9.652,48.133 9.906,47.879 BT4.2@9.906,48.133
  Top Layer w0.4: JP4.3 22.225,37.846 ESP1.8
  Top Layer w0.8: JP4.3 JP4.3@16.98,43.307
  Bottom Layer w0.2: BT4.2@9.906,48.133 10.287,47.752 12.134,47.752 C20.2@14.662,45.224 ; R23.1 R23.1@14.73,49.088 ; R23.1@14.798,48.852 14.798,49.088 R23.1@14.73,49.088 ; JP4.3 16.385,43.307 16.018,43.674 16.018,43.767 14.662,45.124 C20.2@14.662,45.224 ; C20.2@14.662,45.224 14.662,48.988 14.73,49.057 R23.1@14.73,49.088
BUT2: BT5.2 C21.2 ESP1.10 JP4.5 R24.1 | length 30.1
  Top Layer w0.2: BT5.2@3.023,40.767 BT5.2@9.906,40.767
  Top Layer w0.4: JP4.5 16.973,38.018 17.735,38.018 20.447,35.306 ESP1.10
  Bottom Layer w0.2: BT5.2@9.906,40.767 11.372,40.767 14.07,38.068 14.17,38.068 C21.2@14.67,37.568 ; R24.1 14.67,41.332 C21.2@14.67,37.568 ; JP4.5@17.189,37.802 17.488,38.1 17.78,38.1 ; 17.697,37.802 17.364,37.468 C21.2 C21.2@14.67,37.568
BUT3: BT3.2 C19.2 ESP1.11 JP4.6 R22.1 | length 30.3
  Top Layer w0.2: BT3.2@2.896,33.401 BT3.2@9.779,33.401
  Top Layer w0.4: JP4.6 16.891,35.687 18.542,34.036 ESP1.11
  Bottom Layer w0.2: BT3.2@9.779,33.401 9.912,33.268 11.031,33.268 12.55,31.75 12.742,31.75 14.647,29.845 14.67,29.845 14.67,33.585 R22.1 14.662,33.694 15.162,34.194 15.525,34.194 JP4.6@16.891,35.56 ; JP4.6@16.383,35.56 JP4.6@16.891,35.56 ; 17.78,35.56 JP4.6@16.891,35.56
BUT4: BT6.2 C22.2 ESP1.12 JP4.7 R25.1 | length 39.1
  Top Layer w0.2: BT6.2@2.845,26.06 BT6.2@9.728,26.06
  Top Layer w0.4: JP4.7 22.733,33.147 23.114,32.766 ESP1.12
  Bottom Layer w0.2: BT6.2@9.728,26.06 11.913,23.876 12.869,23.876 C22.2@14.662,22.083 ; C22.2@14.662,21.983 C22.2@14.662,22.083 ; R25.1 C22.2@14.662,22.083
  Bottom Layer w0.8: C22.2 14.67,22.074 18.542,25.946 18.542,31.369 JP4.7
CHIP_PU/EN: BT2.2 C6.1 C18.2 ESP1.3 JP2.3 Q1.3 R1.1 R21.1 | length 120.8
  Top Layer w0.2: BT2.2@3.023,55.499 BT2.2@9.906,55.499
  Top Layer w0.4: JP2.3 22.098,50.673 22.098,46.19 24.323,43.965 24.511,43.965 24.742,44.196 ESP1.3
  Top Layer w0.8: v1(5.207,65.913) 9.172,65.913 13.349,61.736 13.349,58.66 14.859,57.15 15.405,57.15 16.548,56.007 JP2.3 21.844,56.007 23.368,57.531 26.38,57.531 26.51,57.401 41.585,57.401 42.623,56.364 42.623,56.264 C6.1@42.823,56.064 ; v1(15.494,89.027) 16.467,88.054 16.467,86.46 Q1.3 ; R1.1 39.487,54.243 40.607,55.364 42.154,55.364 42.623,55.832 42.623,55.864 C6.1@42.823,56.064 ; C6.1 C6.1@42.823,56.064
  Bottom Layer w0.2: BT2.2@9.906,55.499 12.007,55.499 C18.2@14.662,52.844 ; R21.1@14.639,56.585 R21.1@14.662,56.585 ; C18.2 C18.2@14.662,52.844 ; JP2.3@16.383,55.626 JP2.3@17.272,55.626 ; JP2.3@16.383,55.88 15.555,56.708 R21.1 R21.1@14.662,56.585 ; JP2.3@16.764,55.88 JP2.3@17.526,55.88 ; C18.2@14.662,52.844 R21.1@14.662,56.585
  Bottom Layer w0.8: v1(5.207,65.913) 4.318,66.802 4.318,81.915 11.43,89.027 v1(15.494,89.027)
  Bottom Layer w1.5: JP2.3 JP2.3@16.891,56.007
DTR: Q2.2 R11.1 U2.28 | length 24.5
  Top Layer w0.2: Q2.2 5.083,87.31 5.977,88.204 R11.1 9.214,88.104 10.959,86.36 14.441,86.36 15.113,85.688 15.113,83.566 12.67,81.123 12.67,79.461 12.204,78.994 9.779,78.994 8.687,77.902 8.687,77.039 U2.28
GND: BT1.1 BT2.1 BT3.1 BT4.1 BT5.1 BT6.1 C2.2 C3.2 C4.2 C5.2 C6.2 C7.1 C8.2 C9.2 C10.2 C11.2 C12.2 C13.2 C14.2 C15.1 C16.2 C17.1 C18.1 C19.1 C20.1 C21.1 C22.1 D2.1 D3.1 D4.1 D6.1 ESP1.1 ESP1.28 ESP1.29 HLK_1.3 JP1.1 JP2.1 JP5.1 JP8.1 JP8.2 JP8.3 JP8.4 JP8.5 L2.2 L3.2 L5.2 L6.2 P1.4 P2.4 P3.4 P4.4 P5.4 R2.1 R3.1 R4.1 R9.2 R19.1 TVS1.2 TVS3.1 Type_C1.A1 Type_C1.A12 Type_C1.B1 Type_C1.B12 U1.7 U2.3 U2.29 U3.5 U4.3 U4.5 | length 240.3
  Top Layer w0.2: C12.2@30.607,15.493 C12.2
  Top Layer w0.8: U3.5 18.586,21.888 19.701,23.003 20.745,23.003 21.836,21.912 21.836,21.758 22.336,21.258 22.336,21.158 C7.1 22.536,20.858 23.737,19.657 29.031,19.657 30.456,21.082 TVS3.1 30.734,20.86 30.734,15.62 C12.2@30.607,15.493 ; P2.4@22.654,2.365 P2.4 22.733,2.413 P2.4@22.781,2.413 ; JP5.1 25.165,51.962 25.165,53.043 25.986,53.864 25.986,53.964 26.186,54.164 C4.2 C3.2 35.517,54.164 36.638,53.043 39.701,53.043 40.633,53.975 42.734,53.975 C6.2 43.123,54.364 C6.2@42.923,54.364 ; JP8.1 JP8.2@29.845,58.801 ; JP8.2@29.972,58.928 JP8.2@29.845,58.801 ; TVS1.2 31.202,7.493 31.71,6.985 R9.2@34.152,6.985 ; C12.2 31.184,14.916 31.566,14.916 32.831,13.651 32.831,11.176 33.72,10.287 U1.7 ; ESP1.29 36.068,41.021 41.783,46.736 ESP1.28 43.942,51.575 46.383,54.016 46.383,61.068 46.783,61.468 C15.1 48.11,61.595 48.173,61.531 52.261,61.531 JP1.1 ; R9.2 R9.2@34.417,6.984 ; JP8.5 37.592,58.674 37.465,58.801 JP8.4 JP8.3 JP8.2 JP8.2@29.845,58.801
  Top Layer w1.5: C14.2 55.743,68.707 57.693,70.657 70.054,70.657 C5.2@72.131,68.58 ; v2(85.626,2.268) 85.626,2.674 84.328,3.972 HLK_1.3 64.371,29.482 64.371,61.333 68.062,65.024 68.575,65.024 C5.2@72.131,68.58 ; v2(85.725,90.805) 81.026,86.106 81.026,67.564 79.248,65.786 77.325,65.786 74.531,68.58 C5.2 C5.2@72.131,68.58
  other v1: 29.213,15.473 29.718,43.688 23.495,47.625 17.78,65.786 12.681,68.946 5.95,72.756 24.765,79.756
  other v2: 2.187,2.141 2.286,90.678
GPIO0: ESP1.6 JP4.1 | length 11.9
  Top Layer w0.4: JP4.1 17.164,47.987 19.939,45.212 19.939,44.539 24.003,40.475 24.003,40.386 ESP1.6
GPIO1: ESP1.7 JP4.2 | length 11
  Top Layer w0.4: JP4.2 16.764,45.787 23.421,39.13 24.878,39.13 ESP1.7
GPIO7: ESP1.9 JP4.4 | length 10
  Top Layer w0.2: ESP1.9@24.384,36.576 ESP1.9@24.511,36.449
  Top Layer w0.4: JP4.4 16.894,40.637 18.164,40.637 22.225,36.576 24.384,36.576 ESP1.9
GPIO13: ESP1.13 JP4.8 | length 8.5
  Top Layer w0.4: JP4.8 16.966,30.607 17.855,31.496 ESP1.13
GPIO14: ESP1.14 JP4.9 | length 9
  Top Layer w0.4: JP4.9 18.923,30.226 ESP1.14
GPIO25: ESP1.26 JP1.3 | length 16.3
  Top Layer w0.4: ESP1.26 44.742,44.196 48.133,47.587 48.133,52.324 JP1.3
GPIO26: ESP1.27 JP1.2 | length 17.5
  Top Layer w0.4: ESP1.27 44.742,45.466 47.244,47.968 47.244,53.975 JP1.2
IO15: ESP1.19 JP3.5 | length 9.8
  Top Layer w0.4: ESP1.19 48.895,35.306 JP3.5
IO27: ESP1.18 JP3.6 | length 9.3
  Top Layer w0.4: ESP1.18 50.165,34.036 JP3.6
LED1: ESP1.21 JP3.3 R26.1 | length 41.5
  Top Layer w0.2: R26.1@52.381,18.091 52.381,17.995 52.881,17.495 R26.1@52.976,17.495
  Top Layer w0.4: ESP1.21 46.355,37.846 JP3.3
  Top Layer w0.8: JP3.3 57.15,38.989 57.15,22.964 52.381,18.195 R26.1 R26.1@52.381,18.091
LED2: ESP1.23 JP3.1 R27.1 | length 58.5
  Top Layer w0.4: ESP1.23 44.877,40.386 45.112,40.62 45.192,40.62 50.673,46.101 50.673,47.244 JP3.1
  Top Layer w0.8: JP3.1 59.182,42.037 59.182,15.472 52.446,8.736 R27.1
NC: ESP1.20 ESP1.22 JP3.2 JP3.4 | length 27.6
  Top Layer w0.2: ESP1.22@43.923,39.097 ESP1.22
  Top Layer w0.4: ESP1.20 44.787,36.576 45.507,37.296 48.345,37.296 JP3.4 ; ESP1.22 44.346,39.116 44.577,39.347 44.712,39.212 44.973,39.212 52.116,46.355 JP3.2
  Top Layer w0.8: ESP1.22@43.923,39.097 42.513,39.097 42.045,38.628 42.045,37.045 42.494,36.595 43.923,36.595 ESP1.20
NetC1_1: C1.1 F1.2 L1.3 MOV1.1 | length 32.6
  Top Layer w1.5: C1.1 65.191,90.297 65.441,90.047 F1.2 65.441,77.053 MOV1.1 67.871,74.729 71.046,74.729 73.469,77.152 L1.3
NetC1_2: C1.2 HB1.2 L1.1 MOV1.2 | length 34.7
  Top Layer w1.5: C1.2 59.563,88.138 59.745,87.956 59.745,85.822 HB1.2 60.27,85.297 60.27,78.323 MOV1.2 66.077,72.517 75.574,72.517 78.923,69.168 L1.1
NetC8_1: C8.1 U2.22 | length 7.3
  Top Layer w0.2: U2.22 11.66,76.916 11.687,76.889 12.784,76.889 13.5,76.173 13.5,74.003 14.909,72.594 15.357,72.594 C8.1@15.691,72.26
NetC12_1: C12.1 D5.1 R12.1 U1.13 | length 29.1
  Top Layer w0.2: C12.1 31.731,11.069 31.731,10.72 33.264,9.187 44.884,9.187 45.212,9.515 45.212,11.145 43.981,12.376 R12.1 43.881,13.523 41.119,16.285 41.119,16.437 40.919,16.637 U1.13
  Top Layer w0.8: D5.1@27.178,11.811 30.353,11.811 C12.1@30.608,12.066 ; C12.1 C12.1@30.845,11.955
NetC13_1: C13.1 R17.2 R19.2 U2.8 | length 16.2
  Top Layer w0.2: R17.2 9.157,68.519 C13.1 ; U2.8 8.687,71.805 8.687,70.512 9.214,69.985 C13.1 ; R19.2 15.429,64.513 13.775,66.167 11.357,66.167 9.706,67.818 9.706,68.085 C13.1
NetD5_2: D5.2 R12.2 U1.10 U3.4 | length 34.7
  Top Layer w0.2: v1(25.654,15.367) 27.089,15.367 D5.2@27.173,15.284 ; U1.10 40.667,12.629 41.346,12.629 R12.2@43.561,10.414 ; v1(42.333,10.16) 43.307,10.16 R12.2@43.688,10.541
  Top Layer w0.8: U3.4@23.368,14.986 U3.4 24.003,15.069 24.003,16.168 24.472,16.637 26.709,16.637 27.178,16.168 D5.2
  Bottom Layer w0.2: v1(25.654,15.367) 32.024,8.997 32.024,8.6 32.538,8.086 32.935,8.086 33.382,7.639 39.812,7.639 v1@42.4,10.227
NetD6_2: D6.2 L4.1 U4.2 | length 21.6
  Top Layer w0.8: U4.2 35.968,74.698 33.887,74.698 33.147,75.438 33.147,77.343 32.678,77.812 31.286,77.812 30.861,78.237 D6.2 30.861,78.569 31.286,78.994 31.286,79.252 34.103,79.252 39.565,84.714 L4.1@39.565,86.714
NetF1_1: F1.1 HB1.1 | length 5
  Top Layer w1.5: HB1.1 70.201,85.822 70.201,89.499 70.231,89.528 70.231,89.753 F1.1
NetF2_1: F2.1 TVS1.1 TVS2.2 U3.7 | length 24.6
  Top Layer w0.8: F2.1 10.723,9.941 11.323,10.541 TVS2.2@14.478,10.541 ; U3.7 17.399,12.446 16.034,11.081 TVS2.2 TVS2.2@14.478,10.541 ; TVS1.1@26.416,7.747 26.416,7.707 25.777,7.068 25.737,7.068 25.019,6.35 17.653,6.35 14.824,9.179 14.824,10.195 TVS2.2@14.478,10.541
NetF3_1: F3.1 TVS2.1 TVS3.2 U3.6 | length 29.9
  Top Layer w0.8: F3.1 10.668,15.84 11.268,15.24 14.053,15.24 14.212,15.081 16.034,15.081 17.399,13.716 U3.6@19.017,13.716 ; TVS2.1@14.478,16.129 14.478,21.082 17.399,24.003 24.003,24.003 26.031,21.975 26.031,21.507 26.837,20.701 TVS3.2@27.053,20.701
NetHLK_1_1: HLK_1.1 L1.4 | length 23.3
  Top Layer w1.5: HLK_1.1 79.121,60.452 83.185,64.516 83.185,74.414 L1.4
NetHLK_1_2: HLK_1.2 L1.2 | length 30.7
  Top Layer w1.5: HLK_1.2 70.739,56.134 79.756,56.134 85.923,62.301 85.923,69.145 85.916,69.152 L1.2
NetL2_1: L2.1 R5.2 | length 5.3
  Top Layer w0.2: R5.2 42.865,22.164 42.865,21.809 43.11,21.564 44.383,21.564 45.119,20.828 L2.1
NetL3_1: L3.1 R15.1 | length 9.7
  Top Layer w0.2: R15.1@40.77,6.858 43.815,6.858 47.117,10.16 L3.1 46.99,11.43 L3.1@46.99,12.065
NetL5_1: L5.1 R26.2 | length 3.1
  Top Layer w0.8: R26.2 50.481,19.874 L5.1
NetL6_1: L6.1 R27.2 | length 3.4
  Top Layer w0.8: R27.2 50.419,8.763 50.419,10.459 51.39,11.43 L6.1
NetQ1_1: Q1.1 R11.2 | length 3.4
  Top Layer w0.2: R11.2 11.181,88.138 13.139,88.138 13.967,87.31 Q1.1
NetQ2_1: Q2.1 R16.2 | length 4.8
  Top Layer w0.2: Q2.1 5.007,85.41 5.207,85.21 5.283,85.21 6.231,84.262 R16.2
NetR2_2: R2.2 Type_C1.A5 | length 9.9
  Top Layer w0.2: Type_C1.A5 24.511,84.074 25.216,83.369 25.597,83.369 v1(25.654,83.312) ; R2.2 27.686,77.094 v1(27.686,82.296)
  Bottom Layer w0.2: v1(25.654,83.312) 26.654,83.312 27.67,82.296 v1(27.686,82.296)
NetR3_2: R3.2 Type_C1.B5 | length 12.2
  Top Layer w0.2: R3.2 20.255,77.25 19.755,77.75 19.405,77.75 18.161,78.994 18.161,79.629 19.304,80.772 21.829,80.772 22.225,81.168 22.225,82.042 21.463,82.804 Type_C1.B5
NetR4_2: R4.2 T1.2 T1.3 U4.4 | length 29.5
  Top Layer w0.8: T1.2 T1.3 32.512,90.17 32.439,90.17 29.21,86.941 29.21,72.136 30.288,71.058 R4.2 31.881,71.128 35.998,71.128 U4.4
NetR5_1: R5.1 U1.6 | length 17.1
  Top Layer w0.2: v1(32.619,15.22) 33.655,14.183 33.655,12.446 34.319,11.782 34.319,11.757 34.519,11.557 U1.6 ; v1(39.37,21.844) 40.359,21.844 R5.1@40.71,22.195
  Bottom Layer w0.2: v1(32.619,15.22) 32.619,17.379 37.084,21.844 v1(39.37,21.844)
NetR6_1: R6.1 U2.26 | length 9
  Top Layer w0.2: U2.26 9.66,77.732 10.49,78.562 12.337,78.562 13.07,79.295 13.07,80.958 13.393,81.28 15.371,81.28 R6.1
NetR7_1: R7.1 U2.25 | length 10.8
  Top Layer w0.2: U2.25 10.187,77.039 10.187,77.693 10.656,78.162 12.503,78.162 13.47,79.129 13.47,80.045 13.792,80.367 14.375,80.367 15.36,79.382 15.36,76.597 R7.1
NetR8_1: R8.1 U1.9 U3.1 | length 29.6
  Top Layer w0.2: R8.1 22.475,7.874 22.475,7.974 24.086,9.585 U3.1 24.509,11.176 24.709,11.376 24.709,11.628 24.906,11.825 24.939,11.825 25.136,12.022 25.136,12.93 26.684,14.478 29.498,14.478 29.76,14.216 30.996,14.216 32.131,13.081 32.131,10.886 33.43,9.587 41.347,9.587 41.783,10.023 41.783,10.693 40.919,11.557 U1.9
NetR15_2: R15.2 U1.2 U1.11 | length 23.8
  Top Layer w0.2: v1(32.766,8.636) 32.847,8.636 32.998,8.787 38.203,8.787 38.647,8.343 38.647,7.458 38.739,7.366 R15.2@38.989,7.366 ; v1(33.401,16.129) 33.401,16.21 33.671,16.48 33.671,16.496 33.812,16.637 U1.2 36.957,16.637 39.497,14.097 U1.11
  Bottom Layer w0.2: v1(32.766,8.636) 32.766,8.717 32.424,9.059 32.424,14.247 33.401,15.224 v1(33.401,16.129)
NetR18_1: R18.1 U2.9 | length 10.4
  Top Layer w0.2: U2.9 9.16,71.104 9.906,70.358 16.256,70.358 17.217,69.397 17.217,68.625 R18.1
NetU1_3: U1.3 U1.8 | length 8.1
  Top Layer w0.2: U1.3 35.169,15.167 35.633,15.167 37.88,12.92 37.88,12.031 39.536,10.375 40.381,10.375 U1.8
NetU1_12: U1.12 U3.2 U3.3 | length 33.2
  Top Layer w0.2: U3.2 24.369,12.446 24.569,12.646 24.569,12.929 25.646,14.006 v1(25.646,14.597) ; U1.12 40.919,15.367 41.783,14.503 v1(41.783,14.478)
  Top Layer w0.8: U3.2 U3.3
  Bottom Layer w0.2: v1(25.646,14.597) 31.624,8.619 31.624,8.435 32.373,7.686 32.557,7.686 33.004,7.239 41.296,7.239 43.053,8.996 43.053,13.208 v1(41.783,14.478)
RS485_N: F3.2 P1.3 P2.3 P3.3 P4.3 P5.3 R10.1 R13.2 | length 150.4
  Top Layer w0.381: 5.569,13.07 5.792,13.293 5.792,15.753 F3.2 ; P1.3 10.637,2.636 11.651,2.636 11.874,2.859 11.874,3.175 11.065,3.985 6.166,3.985 5.52,4.631 0.467,9.683 0.467,11.839 1.642,13.013 2.382,13.013 3.014,13.646 R10.1 3.214,13.646 3.624,13.236 3.624,13.186 3.845,12.966 5.789,12.966 6.323,12.431 6.323,11.489 7.364,11.489 7.855,10.998 7.855,8.905 8.345,8.414 8.661,8.414 9.327,9.081 9.327,18.02 16.051,24.744 34.035,24.744 36.514,22.264 R13.2 ; P2.3 26.512,2.636 27.526,2.636 27.749,2.859 27.749,3.438 28.931,4.62 39.148,4.62 40.584,3.184 40.584,1.771 41.252,1.102 41.568,1.102 41.854,1.389 41.854,2.103 P3.3 ; P3.3@42.35,2.599 43.505,3.754 46.275,3.754 46.915,3.114 47.231,3.114 48.458,4.341 55.245,4.341 56.863,2.723 57.602,2.723 P4.3 58.135,2.636 59.149,2.636 59.372,2.859 59.372,3.438 60.554,4.62 65.954,4.62 69.549,1.025 70.659,1.025 70.737,1.102 73.064,1.102 73.35,1.389 73.35,2.103 P5.3
  Bottom Layer w0.381: P1.3 10.637,2.19 11.924,2.19 13.646,0.467 23.629,0.467 24.47,1.308 24.742,1.308 25.338,1.904 25.342,1.904 25.851,2.413 P2.3
RS485_P: F2.2 P1.2 P2.2 P3.2 P4.2 P5.2 R9.1 R10.2 | length 142.5
  Top Layer w0.381: P1.2 13.747,2.636 12.733,2.636 12.509,2.859 12.509,3.438 11.328,4.62 6.429,4.62 1.102,9.946 1.102,11.576 1.905,12.378 2.382,12.378 3.014,11.746 R10.2 3.214,11.746 3.847,12.378 4.743,12.378 4.799,12.435 5.569,12.435 5.792,12.211 5.792,9.829 F2.2 6.223,8.648 7.033,7.838 7.884,7.838 7.943,7.779 8.794,7.779 8.859,7.715 9.175,7.715 11.28,5.609 35.042,5.609 36.252,6.819 R9.1 ; P2.2 29.622,2.636 28.608,2.636 28.384,2.859 28.384,3.175 29.194,3.985 38.885,3.985 39.949,2.921 39.949,1.508 40.989,0.467 42.488,0.467 44.21,2.19 47.205,2.19 48.721,3.706 54.982,3.706 56.571,2.116 56.571,1.858 57.357,1.072 58.467,1.072 59.808,2.413 P4.2 61.245,2.636 60.231,2.636 60.008,2.859 60.008,3.175 60.817,3.985 65.691,3.985 69.208,0.467 73.984,0.467 75.706,2.19 76.993,2.19 P5.2
  Bottom Layer w0.381: P1.2 14.265,2.118 14.265,1.248 14.489,1.025 23.288,1.025 24.207,1.943 24.479,1.943 24.948,2.413 24.948,2.968 25.734,3.754 26.844,3.754 27.63,2.968 27.63,1.823 28.285,1.168 28.6,1.168 P2.2
RTS: Q1.2 R16.1 U2.24 | length 14
  Top Layer w0.2: U2.24 10.687,77.039 10.687,77.558 10.891,77.762 12.711,77.762 14.02,79.071 v1(14.02,79.817) ; R16.1 11.449,83.918 11.888,83.918 12.495,83.312 v1(12.573,83.312) 14.167,84.906 Q1.2
  Bottom Layer w0.2: v1(12.573,83.312) 14.02,81.865 v1(14.02,79.817)
RX0: ESP1.24 JP1.5 R6.2 | length 71.8
  Top Layer w0.4: ESP1.24 44.742,41.656 49.935,46.849 49.935,49.046 JP1.5
  Top Layer w0.8: R6.2 17.337,78.669 19.055,76.952 19.055,76.117 20.066,75.106 v1(20.066,71.882)
  Bottom Layer w0.8: v1(20.066,71.882) 22.098,69.85 22.098,58.293 27.051,53.34 38.481,53.34 40.386,51.435 JP1.5
RX_S485: ESP1.16 JP3.8 U1.4 U1.5 | length 46.4
  Top Layer w0.2: U1.5 U1.4 34.519,14.097 32.766,15.85 32.766,17.272 34.798,19.304 36.25,19.304 36.504,19.558 37.661,19.558 38.354,20.251 38.354,23.241 41.402,26.289 53.213,26.289 54.61,27.686 54.61,28.829 JP3.8
  Top Layer w0.4: ESP1.16 51.618,31.496 51.999,31.115 JP3.8
SCL: ESP1.5 JP2.5 JP5.4 | length 13.1
  Top Layer w0.4: JP2.5 20.955,46.736 20.955,44.793 24.073,41.675 24.873,41.675 ESP1.5
SDA: ESP1.4 JP2.4 JP5.3 | length 14.6
  Top Layer w0.4: JP2.4 21.548,48.683 21.548,45.47 23.929,43.089 24.062,43.089 24.13,43.157 24.361,42.926 ESP1.4
  Top Layer w0.8: JP2.4@16.764,53.251 JP2.4
TX0: ESP1.25 JP1.4 R7.2 | length 66.4
  Top Layer w0.4: ESP1.25 44.6,42.926 44.831,43.157 44.899,43.089 44.905,43.089 49.022,47.206 49.022,50.673 JP1.4
  Top Layer w0.8: R7.2 17.337,76.42 v1(19.066,74.692)
  Bottom Layer w0.8: v1(19.066,74.692) 23.114,70.644 23.114,58.691 27.322,54.483 51.6,54.483 52.108,53.975 JP1.4
TX_S485: ESP1.17 JP3.7 R14.1 U1.1 | length 45.4
  Top Layer w0.2: U1.1 35.052,17.99 35.502,17.99 36.67,19.158 37.827,19.158 39.116,20.447 41.425,20.447 43.781,18.091 R14.1 47.428,18.091 49.149,19.812 49.149,23.622 50.419,24.892 53.086,24.892 56.007,27.813 56.007,29.972 JP3.7
  Top Layer w0.4: ESP1.17 51.233,32.766 52.122,33.655 JP3.7
USB_DN: D3.2 Type_C1.A7 Type_C1.B7 U2.5 | length 31
  Top Layer w0.2: v1(6.267,74.362) 6.707,73.922 U2.5 ; v1(19.558,80.137) 22.479,80.137 22.86,80.518 D3.2 22.987,81.407 Type_C1.A7 22.987,85.598 23.114,85.725 23.876,85.725 24.003,85.598 Type_C1.B7
  Bottom Layer w0.2: v1(6.267,74.362) 5.8,74.829 5.8,74.845 5.715,74.93 5.715,78.486 6.496,79.267 18.942,79.267 19.218,79.543 19.218,79.716 19.558,80.056 v1(19.558,80.137)
USB_DP: D4.2 Type_C1.A6 Type_C1.B6 U2.4 | length 37.5
  Top Layer w0.2: v1(6.35,75.057) 6.958,74.449 7.543,74.449 U2.4 ; v1(19.445,78.867) 22.81,78.867 25.223,81.28 D4.2 25.273,82.296 23.608,83.961 23.491,84.078 Type_C1.A6 ; v1(22.426,83.579) 22.452,83.605 22.452,84.809 Type_C1.B6
  Bottom Layer w0.2: v1(6.35,75.057) 6.35,75.089 6.115,75.324 6.115,78.32 6.662,78.867 v1(19.445,78.867) 20.701,78.867 22.437,80.603 22.437,83.568 v1(22.426,83.579)
VBUSA: C11.1 C16.1 D1.1 D2.2 R17.1 Type_C1.A4 Type_C1.A9 Type_C1.B4 Type_C1.B9 U2.7 | length 63
  Top Layer w0.2: R17.1 2.737,71.939 ; C11.1 2.794,76.962 2.794,73.078 C16.1 2.737,71.939 ; v1(8.001,70.358) 7.57,70.789 U2.7 7.247,72.922 5.572,71.247 3.429,71.247 2.737,71.939 ; v1(18.373,70.358) 20.011,70.358 21.408,68.961 D1.1 21.463,69.406 21.463,74.041 23.584,76.162 23.584,77.432 25.781,79.629 26.67,79.629 27.286,80.245 27.286,81.68 26.416,82.55 26.416,83.328 25.783,83.961 25.767,83.961 25.767,84.171 ; Type_C1.A9 20.701,85.261 20.762,85.322 20.806,85.322 ; D2.2 21.413,81.28 21.313,81.38 21.313,81.43 20.955,81.788 Type_C1.B4 20.955,85.261 20.905,85.311 20.817,85.311 20.806,85.322 ; Type_C1.A4 25.767,84.822 25.767,84.171 ; 20.806,85.322 20.784,85.344 20.828,85.344 21.717,86.233 24.765,86.233 25.527,85.471 25.527,84.411 25.767,84.171
  Bottom Layer w0.2: v1(8.001,70.358) v1(18.373,70.358)
pads on no net: ESP1.30 ESP1.31 ESP1.32 Type_C1. Type_C1.A8 Type_C1.B8 U2.1 U2.2 U2.10 U2.11 U2.12 U2.13 U2.14 U2.15 U2.16 U2.17 U2.18 U2.19 U2.20 U2.21 U2.23 U2.27

## Polygon pours and split planes (outlines as drawn)
GND on Bottom Layer "NONET_L-01_P-001" (solid, pour order 0): 0,92.964 53.848,92.964 53.848,74.803 51.816,74.803 51.816,63.119 53.975,63.119 53.975,4.572 88.011,4.572 88.011,0 0,0
GND on Top Layer "NONET_L-01_P-001" (solid, pour order 2): 0,92.964 53.848,92.964 53.848,74.803 51.816,74.803 51.816,63.119 53.975,63.119 53.975,4.572 88.011,4.572 88.011,0 0,0

## Keep-outs
Keep-Out Layer:
  the board outline again, w0.254

## Silkscreen, mask and mechanical layers (free items; w line width, h text height)
Top Overlay:
  drawing of 2 lines, arcs and shapes, not listed

## Text inside footprints (layer, text, board x,y; h text height)
HLK_1: Top Overlay "HLK-20M05" at 60.779,7.439 h1
U4: Top Overlay "1" at 36.119,77.924 h1 r270